# Altium PCB Alarm-Clock-v1.1.PcbDoc (part 3 of 4)
Units mm, origin at the board's own origin, x right, y up, seen from the top; angles counter-clockwise.
Board outline 56 x 73 mm, 2 copper layers (Top Layer, Bottom Layer), stack 1.448 mm thick; 146 components, 110 nets, 466 pads, 352 vias.
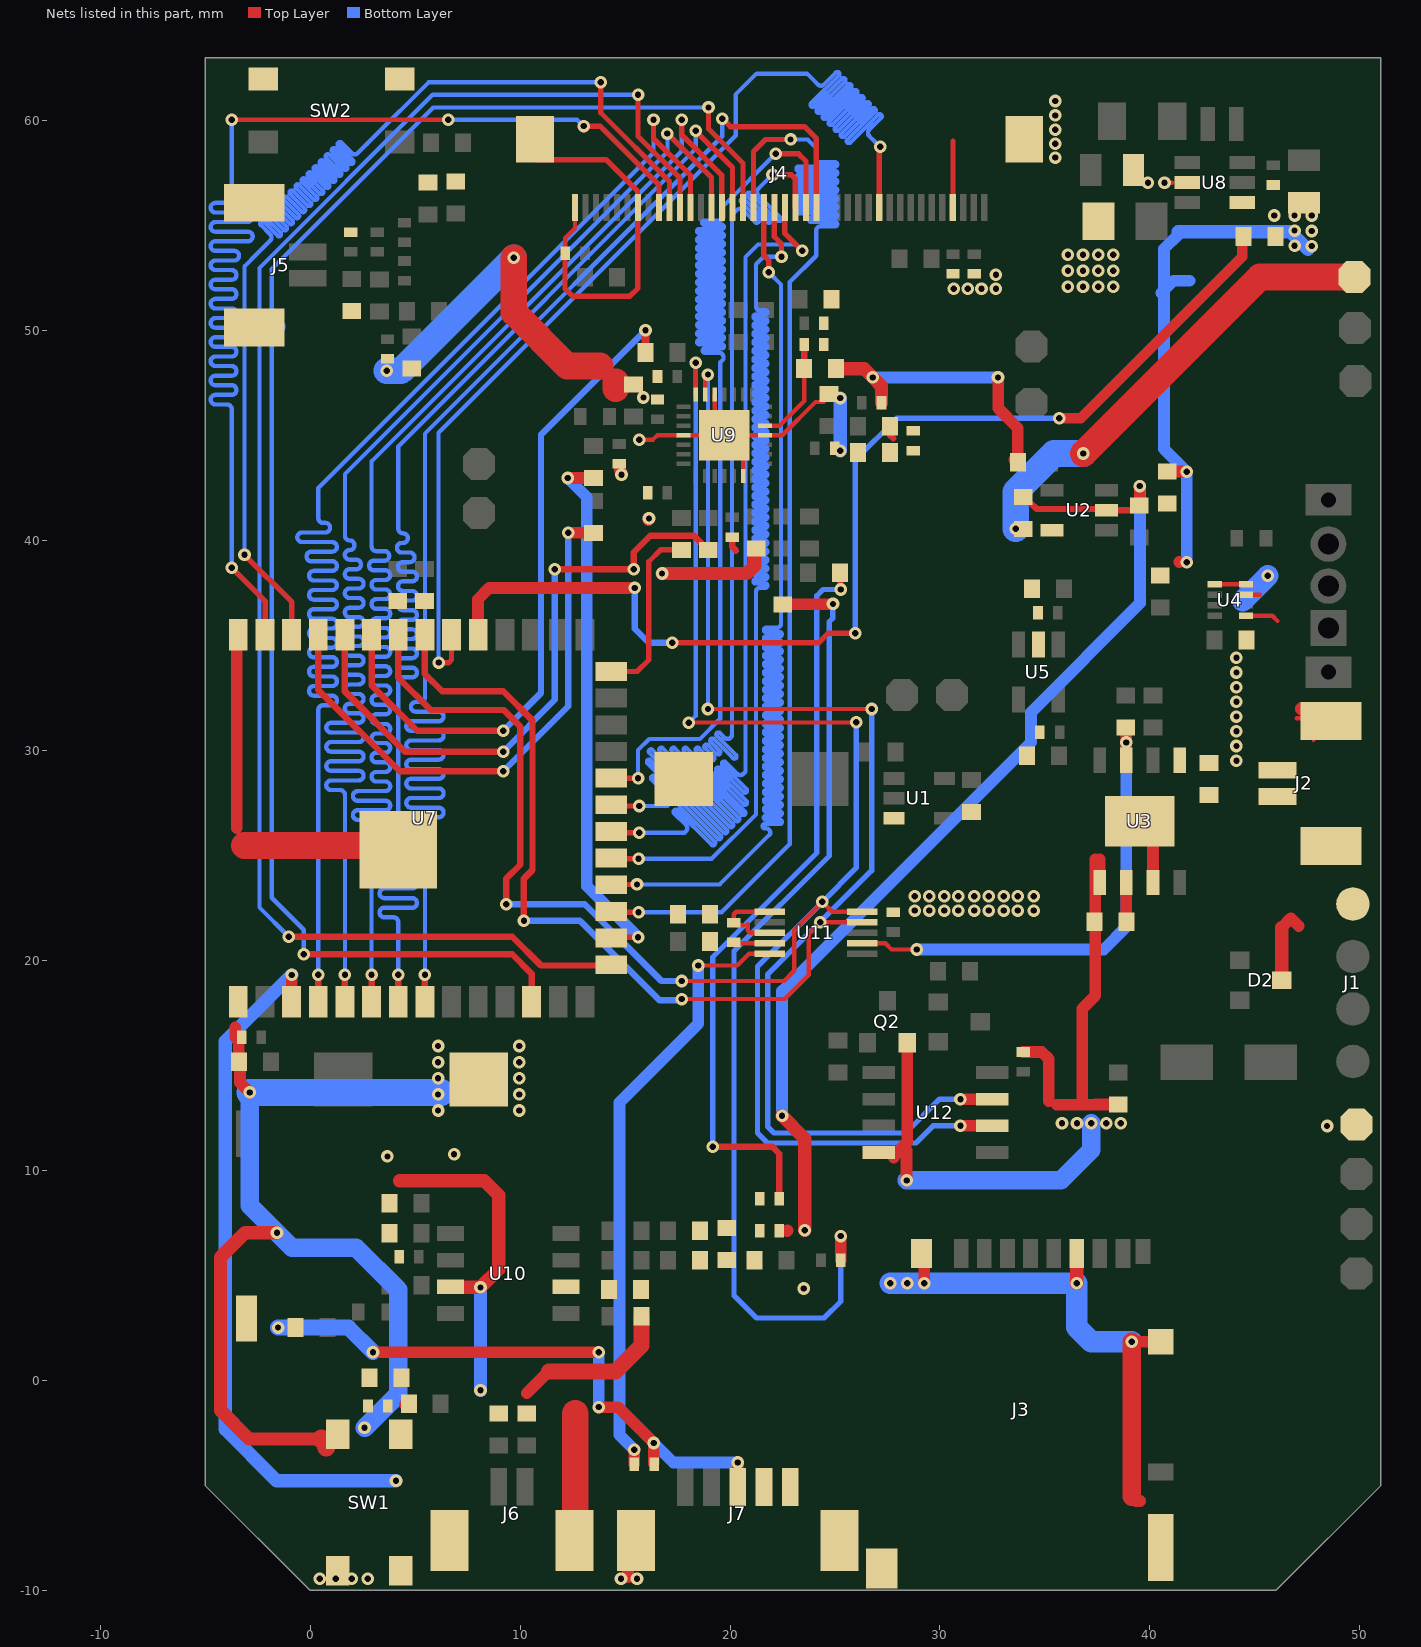
[diagram p2: the nets of this part, all layers, seen from the top]

## Via types
v1: diameter 0.6, hole 0.3, Top Layer to Bottom Layer, tented both sides, 187 vias
v2: diameter 0.6, hole 0.3, Top Layer to Bottom Layer, 165 vias

## Nets (pads, with @x,y where several pads share a name; then routed paths per layer and width w, separated by ;. In a path a pad name is that pad's centre, name@x,y a point inside that pad or via, vN(x,y) a via of type N, cw(c..) or ccw(c..) an arc to the next point about the centre after c; other vN are vias at no path point) (continued)
AGND: C4.2 C5.1 C7.2 C24.1 C25.1 C26.1 C27.2 C28.2 C29.2 C30.1 C31.1 C36.1 C37.1 C38.2 C39.2 C41.1 C43.1 C44.2 C45.2 C46.2 C47.2 C48.2 C49.2 C50.2 C51.2 C52.2 C53.2 C54.2 C57.2 J5.MP1 J5.MP2 J6.MP1 J6.MP2 R4.1 R27.2 R31.1 SB3.1 SB5.1 U2.2 U9.4 U9.13 U9.18 U9.26 U9.29 U10.7 | length 132.2
  Top Layer w0.203: v1(15.672,44.806) 16.332,44.806 16.543,45.017 U9.4@17.79,45.017 U9.29@19.273,45.017 ; v1(15.875,46.812) 15.9,46.787 v1@15.926,46.787 ; U9.29@19.273,45.467 U9.26@19.273,46.95 ; U9.29@20.173,45.017 U9.18@21.656,45.017 22.487,45.017 24.067,46.597 24.448,46.597 24.834,46.982 C38.2@24.859,46.982 ; U9.13@20.623,43.084 U9.29@20.623,44.567
  Top Layer w0.254: U9.29@19.273,45.467 U9.29@19.723,45.017
  Top Layer w0.305: C31.1@20.104,40.216 C31.1@20.104,40.165 20.104,39.701 20.283,39.522 ; C30.1@21.138,39.522 21.174,39.559 C30.1@21.247,39.632 ; C7.2@33.964,42.084 34.027,42.084 34.027,42.071 34.29,41.808 34.303,41.808 34.608,41.504 U2.2@37.925,41.504 ; U2.2@37.931,41.449 U2.2@37.929,41.451 ; C4.2@39.402,41.504 39.529,41.631 39.529,41.51 C4.2@39.522,41.504 ; C4.2@39.485,41.664 39.272,41.451 U2.2@37.929,41.451 ; U2.2@37.929,41.451 37.927,41.453 37.925,41.451 U2.2@37.929,41.451
  Top Layer w0.559: U10.7@6.763,4.453 U10.7@6.78,4.435 ; v1@8.108,4.435 v1(8.116,4.427) ; 10.325,-0.618 11.376,0.432 ; v1@14.745,43.34 14.834,43.252 v1(14.834,43.129) ; R31.1@15.782,2.975 R31.1@15.863,3.056 ; v1@16.117,40.978 16.142,41.003 v1(16.142,41.054) ; 22.721,7.12 22.738,7.137 ; v1@23.551,7.137 v1(23.559,7.145) ; v2@32.774,47.771 32.774,46.296 33.71,45.36 C5.1@33.71,43.735 ; C4.2@39.485,41.664 39.515,41.694 39.515,42.588 v2(39.522,42.596)
  Top Layer w0.635: 4.255,9.507 8.293,9.507 8.979,8.822 8.979,5.291 v1(8.116,4.427) ; U10.7@6.78,4.435 v1@8.108,4.435 ; v1(16.764,38.43) 20.803,38.43 21.174,38.802 21.174,39.559 21.174,39.568 21.238,39.632 C30.1@21.247,39.632 ; v1(22.479,12.598) 23.559,11.519 v1(23.559,7.145) ; C46.2@25.032,48.115 C46.2@25.1,48.184 ; C46.2@25.126,48.184 26.391,48.184 v2(26.803,47.771) 27.216,47.358 C39.2@27.216,46.566 ; C5.1@33.592,43.853 C5.1@33.71,43.735
  Top Layer w0.762: 11.376,0.432 14.554,0.432 15.782,1.659 R31.1@15.782,2.975
  Top Layer w1.27: v1(9.703,53.467) 9.703,50.851 12.243,48.311 13.81,48.311 ; J6.MP2@12.621,-7.516 12.621,-1.577 ; 14.554,47.244 14.554,47.567
  Bottom Layer w0.559: v1(22.479,12.598) 22.479,18.542 34.341,30.404 34.341,31.826 39.522,37.008 v2(39.522,42.596) ; v2(26.803,47.771) v2(32.766,47.771)
  Bottom Layer w0.635: v1(8.116,-0.475) v1(8.116,4.427) ; v1(25.248,44.272) v1(25.248,46.787)
  Bottom Layer w1.27: v1(3.658,48.082) 4.318,48.082 v1(9.703,53.467)
  other v1: 23.508,4.377
BAT_ADC: C59.2 R34.1 R35.1 U11.4 | length 1.7
  Top Layer w0.203: C59.2@20.181,20.861 20.223,20.818 U11.4@21.892,20.818
BATT: C6.1 J2.2 P2.1 R8.2 U3.5 U4.3 | length 2.5
  Top Layer w0.203: U4.3@44.568,37.418 45.245,37.418
  Top Layer w1.27: P2.1@49.759,12.116 P2.1@49.835,12.192
  Bottom Layer w1.016: 44.425,37.135 v2(45.618,38.329)
  other v2: 48.438,12.116 44.12,29.515 44.12,30.215 44.12,30.915 44.12,31.616 44.12,32.316 44.12,33.016 44.12,33.717 44.12,34.417
BUT: SB6.1 U11.5 | length 29.2
  Top Layer w0.203: v1(18.491,19.761) 20.342,19.761 20.899,20.318 U11.5@21.892,20.318
  Top Layer w0.559: SB6.1@15.443,-4 v1(15.443,-3.302)
  Bottom Layer w0.559: v1(15.443,-3.302) 14.732,-2.591 14.732,13.233 18.491,16.993 v1(18.491,19.761)
BUT_IN: J7.3 R2.2 SB6.2 SW3.2 | length 28.1
  Top Layer w0.559: v1(2.997,1.346) v1(13.754,1.346) ; v1@13.749,-1.278 14.667,-1.278 v1@16.364,-2.975 ; SB6.2@16.372,-3.962 v1(16.372,-2.983) ; J7.3@20.371,-5.075 v1@20.371,-4.013
  Bottom Layer w0.559: v1(13.754,-1.27) v1(13.754,1.346) ; v1(16.372,-2.983) 17.301,-3.912 v1(20.371,-3.912)
  Bottom Layer w0.762: v1(-1.524,2.515) 1.829,2.515 v1(2.997,1.346)
BYP: C57.1 U10.2
CHRG: R7.1 U3.7 U11.7 | length 23.5
  Top Layer w0.203: U11.7@26.292,20.818 27.393,20.818 27.688,20.523 v1(28.893,20.523)
  Top Layer w0.559: R7.1@38.773,31.072 38.791,31.072 38.867,30.996 38.867,30.394 v1(38.875,30.386) U3.7@38.875,29.536
  Bottom Layer w0.559: v1(28.893,20.523) 37.8,20.523 38.875,21.598 v1(38.875,30.386)
CODEC_3V3: C7.1 C44.1 C45.1 P5.1 R24.1 U2.5 | length 22.3
  Top Layer w0.305: R24.1@27.623,45.017 27.77,44.869
  Top Layer w1.27: v1(36.83,44.145) 45.237,52.553 P5.1@49.733,52.553
  Bottom Layer w1.27: v1(33.604,40.564) 33.604,42.316 35.433,44.145 v1(36.83,44.145)
DAC_R+: R23.1 SB1.1 | length 47.4
  Top Layer w0.559: R23.1@22.517,36.965 24.876,36.965 24.886,36.975 v1@24.891,36.969 ; SB1.1@25.273,5.723 v1(25.273,6.873)
  Bottom Layer w0.254: v1@24.888,36.972 24.888,36.293 24.727,36.131 24.727,24.981 20.193,20.447 20.193,4.039 21.26,2.972 24.486,2.972 25.273,3.759 v1(25.273,6.873)
  other v1: 24.905,36.982
DAC_R-: R22.1 SB2.1 | length 35.9
  Top Layer w0.305: v1(19.177,11.125) 22.022,11.125 22.352,10.795 SB2.1@22.352,8.644 ; R22.1@25.235,38.514 25.254,38.495 25.254,37.687 v1(25.273,37.668)
  Bottom Layer w0.254: v1(19.177,11.125) 19.177,20.168 24.13,25.121 24.13,37.363 24.435,37.668 v1(25.273,37.668)
DACVREF: C46.1 C47.1 U9.19 | length 5
  Top Layer w0.203: U9.19@21.656,45.467 22.353,45.467 23.533,46.647 C46.1@23.533,48.268
  Top Layer w0.305: C46.1@23.533,48.268 C47.1@23.533,49.258
EN_: C16.2 C17.2 R10.1 SW1.3 SW1.4 U7.3 | length 33.6
  Top Layer w0.559: U7.3@-0.881,18.024 -0.879,18.027 -0.879,19.309 v1(-0.876,19.312) ; R10.1@4.521,-1.143 R10.1@4.64,-1.024
  Bottom Layer w0.635: v1(-0.876,19.312) -4.039,16.149 -4.039,-2.337 -1.6,-4.775 v1(4.089,-4.775)
GND: C1.1 C2.2 C3.2 C6.2 C8.2 C9.2 C10.2 C11.2 C12.2 C13.2 C14.2 C15.2 C16.1 C17.1 C18.2 C19.2 C20.2 C21.2 C22.2 C23.2 C59.1 C60.2 C61.2 D2.3 J1.4 J2.1 J2.MP1 J2.MP2 J3.6 J3.S1 J3.S2 J3.S3 J3.S4 J4.4 J4.34 J4.40 J4.MP1 J4.MP2 J7.4 J7.5 J7.MP1 J7.MP2 Q2.2 R4.2 R5.1 R14.2 R16.1 R35.2 SW1.1 SW1.2 SW2.3 SW2.4 U1.3 U3.1 U3.3 U3.9 U4.1 U4.4 U4.5 U5.2 U7.1 U7.40 U7.41 U8.2 U11.1 U11.3 U12.4 | length 197.6
  Top Layer w0.203: C21.2@12.154,53.678 12.154,54.415 12.615,54.875 J4.40@12.615,55.863 ; 20.626,21.674 20.308,21.674 C59.1@20.181,21.801 20.181,22.199 20.3,22.318 U11.1@21.892,22.318 ; 20.841,21.725 20.841,21.437 20.96,21.318 U11.3@21.892,21.318 ; v2(40.693,57.041) 41.061,57.041 ; U4.5@43.088,37.918 U4.4@44.568,37.918 ; U4.1@44.568,36.418 45.827,36.418 46.076,36.17 ; 46.998,31.534 47.531,31.534 47.693,31.534 J2.MP2@47.79,31.437 ; J2.MP2@47.79,30.513 J2.MP2@47.79,31.437 ; J2.MP2@48.634,31.437 48.492,31.437 J2.MP2@47.79,31.437
  Top Layer w0.254: J4.MP1@10.77,58.141 14.097,58.141 15.592,56.646 15.592,55.876 15.605,55.863 15.605,52.003 15.24,51.638 12.497,51.638 12.141,51.994 12.141,53.665 C21.2@12.154,53.678 ; J4.4@30.615,55.863 30.617,55.866 30.617,59.009 30.62,59.012
  Top Layer w0.559: -3.568,16.823 -3.568,16.352 -3.404,16.188 -3.404,15.045 -3.342,14.983 -3.342,14.188 v2(-2.87,13.716) ; U7.1@-3.495,18.098 U7.1@-3.421,18.024 ; -3.495,26.314 -3.495,35.451 U7.40@-3.421,35.524 ; U7.41@3.997,25.476 U7.41@4.199,25.274 ; 15.138,-9.373 15.138,-8.585 15.521,-8.203 J7.MP1@15.521,-7.625 ; U12.4@27.794,10.6 27.794,10.684 28.446,11.336 Q2.2@28.446,16.077 ; 28.41,10.955 28.41,9.537 v1(28.423,9.525) ; v1@29.25,4.656 J3.S1@29.25,6.065 ; C61.2@33.973,15.642 34.852,15.642 35.179,15.314 35.179,13.31 ; 35.56,13.132 37.414,13.132 37.418,13.136 38.49,13.136 C3.2@38.494,13.14 ; J3.6@36.489,6.04 J3.6@36.491,6.042 ; 36.779,13.31 36.779,17.704 37.402,18.326 U3.1@37.402,23.909 ; 37.402,24.82 U3.1@37.402,23.909 ; U3.1@37.592,23.718 U3.1@37.402,23.909 ; U3.1@37.605,23.718 37.605,24.82 ; U3.9@39.06,26.627 U3.9@39.51,26.627 40.145,25.992 U3.3@40.145,23.718 ; 39.141,-5.529 39.352,-5.74 39.522,-5.74 ; v1@39.141,1.839 v1(39.141,1.837) 39.144,1.839 40.489,1.839 J3.S2@40.491,1.842 ; R4.2@40.831,43.289 40.835,43.285 41.754,43.285 v2(41.758,43.282) ; 41.402,38.964 41.402,38.989 ; 46.272,21.57 46.717,22.015 47.092,21.641
  Top Layer w0.635: v2(-1.575,7.036) -3.099,7.036 -4.267,5.867 -4.267,-1.422 -2.896,-2.794 0.546,-2.794 ; J4.MP2@33.964,59.164 J4.MP2@34.015,59.113 ; v1@36.515,4.631 J3.6@36.515,6.04 ; D2.3@46.272,19.06 46.272,21.57 ; J2.MP2@47.228,31.99 47.493,31.99 47.531,31.952 47.531,31.534 47.633,31.433 J2.MP2@47.785,31.433 ; J2.MP2@47.994,31.935 48.492,31.437 48.522,31.408 J2.MP2@48.626,31.408
  Top Layer w0.889: 0.546,-2.794 0.762,-3.01 0.762,-3.175 ; 39.141,-5.529 v1(39.141,1.837)
  Top Layer w1.27: -3.124,25.476 U7.41@3.997,25.476
  Bottom Layer w0.559: 40.538,51.791 40.665,51.918 ; 41.351,54.572 40.665,53.886 40.665,51.918 ; v2@41.758,39.167 v2@41.758,43.27 ; v2(41.758,43.282) 40.665,44.374 40.665,51.918 ; 41.885,52.375 41.123,52.375 40.665,51.918
  Bottom Layer w0.635: 41.351,54.704 46.687,54.704 v2@47.526,53.866
  Bottom Layer w0.889: v2@-2.87,13.71 -2.87,8.331 v2(-1.575,7.036) -0.864,6.325 2.184,6.325 4.191,4.318 4.191,-0.66 v1@2.599,-2.253 ; v1(28.423,9.525) 35.763,9.525 37.211,10.973 v2(37.211,12.243)
  Bottom Layer w1.016: v1(27.635,4.631) v1(28.442,4.631) v1(29.248,4.631) v1(36.513,4.631) 36.513,2.527 37.203,1.837 v1(39.141,1.837)
  Bottom Layer w1.27: v2@-2.87,13.71 v2@6.248,13.71
  other v1: 0.457,-9.449 1.219,-9.449 1.981,-9.449 2.743,-9.449 14.808,-9.449 15.57,-9.449 2.591,-2.261
  other v2: 3.683,10.668 6.858,10.77 35.814,12.243 36.525,12.243 37.922,12.243 38.608,12.243 6.096,12.852 9.96,12.852 6.096,13.621 9.96,13.621 6.096,14.389 9.96,14.389 6.096,15.158 9.96,15.158 6.096,15.926 9.96,15.926 28.804,22.377 29.489,22.377 30.201,22.377 30.875,22.377 31.637,22.377 32.323,22.377 33.034,22.377 33.709,22.377 34.471,22.377 28.804,23.063 29.489,23.063 30.201,23.063 30.875,23.063 31.637,23.063 32.323,23.063 33.034,23.063 33.709,23.063 34.471,23.063 41.758,38.964 30.658,51.994 31.318,51.994 31.979,51.994 32.664,51.994 36.093,52.095 36.813,52.095 37.533,52.095 38.252,52.095 32.664,52.654 36.093,52.857 36.813,52.857 37.533,52.857 38.252,52.857 36.093,53.619 36.813,53.619 37.533,53.619 38.252,53.619 46.891,54.043 47.701,54.026 47.701,54.745 46.891,54.763 45.923,55.483 46.891,55.483 47.701,55.483 39.906,57.041 35.484,58.242 35.484,58.903 35.484,59.563 35.484,60.249 35.484,60.935
I2C_PORT.SCL: R12.1 U7.34 U9.28 U11.10 U12.6 | length 98.9
  Top Layer w0.203: v1(17.704,19.025) 22.581,19.025 23.063,19.507 23.063,21.458 v1(24.397,22.792) 24.87,22.318 U11.10@26.292,22.318 ; v1(18.034,31.318) 18.047,31.331 25.997,31.331 v1(26.01,31.344) ; U9.28@18.365,46.959 U9.28@18.365,47.257 ; U9.28@18.364,47.258 v1(18.364,48.463)
  Top Layer w0.305: U7.34@4.199,35.524 4.199,33.47 5.74,31.928 9.22,31.928 10.008,31.14 10.008,24.562 9.347,23.901 v1(9.347,22.682)
  Top Layer w0.559: v1(30.976,12.124) U12.6@32.482,12.124
  Bottom Layer w0.203: v1(18.034,31.318) 18.364,31.648 v1(18.364,48.463)
  Bottom Layer w0.254: v1(26.01,31.344) 26.01,24.404 v1(24.397,22.792) 21.311,19.705 21.311,11.786 21.793,11.303 28.854,11.303 29.675,12.124 v1(30.976,12.124)
  Bottom Layer w0.305: v1(9.347,22.682) 13.081,22.682 16.739,19.025 v1(17.704,19.025)
I2C_PORT.SDA: R11.1 U7.33 U9.27 U11.9 U12.7 | length 96.2
  Top Layer w0.203: v1(17.704,18.161) 22.606,18.161 23.749,19.304 23.749,21.28 v1(24.295,21.826) 24.299,21.822 26.288,21.822 U11.9@26.292,21.818 ; U9.27@18.823,46.95 18.823,47.672 18.948,47.797 v1(18.948,47.904) ; v1@19.05,31.979 v1(26.746,31.979)
  Top Layer w0.305: U7.33@5.469,35.524 5.469,33.647 6.293,32.823 9.195,32.823 10.592,31.426 10.592,24.308 10.185,23.901 v1(10.185,21.895)
  Top Layer w0.559: v1(30.976,13.394) U12.7@32.482,13.394
  Bottom Layer w0.203: v1(18.948,31.979) v1(18.948,47.904) ; v1@18.974,32.055 v1@19.05,31.979
  Bottom Layer w0.254: v1(26.746,31.979) 26.746,24.277 v1(24.295,21.826) 21.793,19.324 21.793,12.09 22.098,11.786 28.372,11.786 29.98,13.394 v1(30.976,13.394)
  Bottom Layer w0.305: v1(10.185,21.895) 12.852,21.895 16.643,18.105 17.647,18.105 v1(17.704,18.161)
I2S_DIN: R21.2 U7.36 | length 29.8
  Top Layer w0.305: U7.36@1.659,35.524 1.659,32.809 4.521,29.947 v1@9.119,29.947 ; v1(11.659,38.633) v1(15.418,38.633) 15.418,39.446 16.205,40.234 18.283,40.234 18.669,39.848 18.669,39.784 18.898,39.556 R21.2@18.961,39.556
  Bottom Layer w0.305: v1(9.195,29.947) 11.659,32.41 v1(11.659,38.633)
I2S_DOUT: R19.2 U7.37 | length 26.9
  Top Layer w0.305: U7.37@0.389,35.524 0.389,32.885 4.267,29.007 v1@9.144,29.007
  Top Layer w0.559: v1(12.297,40.368) R19.2@13.5,40.368
  Bottom Layer w0.305: v1(9.195,29.007) 12.297,32.109 v1(12.297,40.368)
I2S_LRCK: R20.2 U7.26 | length 8.5
  Top Layer w0.254: U7.26@14.339,33.764 15.578,33.764 16.129,34.315 16.129,38.989 16.696,39.556 R20.2@17.691,39.556
I2S_MCLK: R17.2 U7.35 | length 32.5
  Top Layer w0.305: U7.35@2.929,35.524 2.929,33.114 5.105,30.937 v1(9.195,30.937)
  Top Layer w0.381: R17.2@15.964,48.954 15.97,48.96 15.97,50.006 v1(15.977,50.013)
  Bottom Layer w0.305: v1(9.195,30.937) 10.998,32.741 10.998,45.034 v1(15.977,50.013)
I2S_SCLK: R18.2 U7.16 | length 25.8
  Top Layer w0.254: U7.16@14.339,21.064 14.382,21.107 v1(15.621,21.107)
  Top Layer w0.559: v1(12.275,42.981) 13.335,42.981 13.339,42.985 R18.2@13.5,42.985
  Bottom Layer w0.559: v1(12.275,42.981) 13.183,42.074 13.183,23.546 v1(15.621,21.107)
IN+#: C55.1 C58.2 R32.1
IN-#: C56.1 C58.1 SB2.2 SB3.2
ISET: R5.2 U3.2 | length 1.9
  Top Layer w0.559: R5.2@38.875,21.852 U3.2@38.875,23.718
LCD_BL_EN: R14.1 U7.31 U8.4 | length 54
  Top Layer w0.254: v1(17.247,35.128) 24.219,35.128 24.676,35.585 v1(25.959,35.585)
  Top Layer w0.508: v1(35.687,45.822) 36.703,45.822 44.402,53.52 R14.1@44.402,54.419
  Top Layer w0.559: U7.31@7.996,35.512 7.996,37.206 8.534,37.744 v1(15.462,37.744)
  Top Layer w0.635: R14.1@44.402,54.419 R14.1@44.465,54.483
  Bottom Layer w0.254: v1(25.959,35.585) 25.959,43.84 27.94,45.822 v1(35.687,45.822)
  Bottom Layer w0.305: v1(15.462,37.744) 15.462,35.795 16.129,35.128 v1(17.247,35.128)
LCD_CS: J4.11 U7.32 | length 76.1
  Top Layer w0.254: v1(6.121,34.188) 6.135,34.175 6.59,34.175 6.739,34.324 U7.32@6.739,35.524 ; J4.11@27.115,55.863 v1@27.115,58.75
  Bottom Layer w0.203: v1(6.121,34.188) 6.121,45.136 20.269,59.284 20.269,61.239 21.268,62.238 23.665,62.238 24.113,61.79 24.184,61.718 ccw(c24.328,61.862) 24.472,61.718 25.041,62.288 cw(c25.113,62.216) 25.185,62.288 cw(c25.113,62.216) 25.185,62.144 23.868,60.827 ccw(c23.94,60.756) 23.868,60.684 ccw(c23.94,60.756) 24.012,60.684 25.329,62.001 cw(c25.401,61.929) 25.473,62.001 cw(c25.401,61.929) 25.473,61.857 24.156,60.54 ccw(c24.227,60.468) 24.156,60.396 ccw(c24.227,60.468) 24.299,60.396 25.616,61.713 cw(c25.688,61.641) 25.76,61.713 cw(c25.688,61.641) 25.76,61.57 24.443,60.253 ccw(c24.515,60.181) 24.443,60.109 ccw(c24.515,60.181) 24.587,60.109 25.904,61.426 cw(c25.975,61.354) 26.047,61.426 cw(c25.975,61.354) 26.047,61.282 24.73,59.965 ccw(c24.802,59.893) 24.73,59.822 ccw(c24.802,59.893) 24.874,59.822 26.191,61.139 cw(c26.263,61.067) 26.335,61.139 cw(c26.263,61.067) 26.335,60.995 25.018,59.678 ccw(c25.089,59.606) 25.018,59.534 ccw(c25.089,59.606) 25.161,59.534 26.478,60.851 cw(c26.55,60.779) 26.622,60.851 cw(c26.55,60.779) 26.622,60.707 25.305,59.391 ccw(c25.377,59.319) 25.305,59.247 ccw(c25.377,59.319) 25.449,59.247 26.766,60.564 cw(c26.838,60.492) 26.909,60.564 cw(c26.838,60.492) 26.909,60.42 25.592,59.103 ccw(c25.664,59.031) 25.592,58.959 ccw(c25.664,59.031) 25.736,58.959 27.053,60.276 cw(c27.125,60.205) 27.197,60.276 cw(c27.125,60.205) 27.197,60.133 26.627,59.563 ccw(c26.771,59.419) 26.627,59.276 26.883,59.019 v1(27.153,58.75)
LCD_DB1: J4.17 U7.8 | length 76
  Top Layer w0.254: v1(19.634,60.096) 20.015,59.715 23.546,59.715 24.115,59.146 J4.17@24.115,55.863
  Top Layer w0.305: U7.8@5.469,18.024 v1(5.469,19.32)
  Bottom Layer w0.203: v1(5.469,19.32) 5.469,26.035 5.469,26.137 ccw(c5.24,26.137) 5.24,26.365 4.808,26.365 cw(c4.808,26.594) 4.808,26.822 6.129,26.822 ccw(c6.129,27.051) 6.129,27.28 4.808,27.28 cw(c4.808,27.508) 4.808,27.737 6.129,27.737 ccw(c6.129,27.965) 6.129,28.194 4.808,28.194 cw(c4.808,28.423) 4.808,28.651 6.129,28.651 ccw(c6.129,28.88) 6.129,29.108 4.808,29.108 cw(c4.808,29.337) 4.808,29.566 6.129,29.566 ccw(c6.129,29.794) 6.129,30.023 4.808,30.023 cw(c4.808,30.251) 4.808,30.48 6.129,30.48 ccw(c6.129,30.709) 6.129,30.937 4.808,30.937 cw(c4.808,31.166) 4.808,31.394 6.129,31.394 ccw(c6.129,31.623) 6.129,31.852 5.029,31.852 cw(c5.029,32.08) 5.029,32.309 5.24,32.309 ccw(c5.24,32.537) 5.469,32.537 5.469,33.147 5.469,45.093 19.634,59.258 v1(19.634,60.096)
LCD_DB2: J4.18 U7.22 | length 75.8
  Top Layer w0.254: U7.22@14.339,28.684 14.346,28.677 v1(15.621,28.677) ; v1(22.174,58.42) 23.266,58.42 23.618,58.068 J4.18@23.618,55.917
  Bottom Layer w0.203: v1(15.621,28.677) 15.621,30.023 16.152,30.554 18.565,30.554 19.533,31.521 19.533,48.489 19.685,48.641 19.685,48.743 ccw(c19.482,48.743) 19.482,48.946 18.803,48.946 cw(c18.803,49.047) 18.803,49.149 19.609,49.149 ccw(c19.609,49.251) 19.609,49.352 18.534,49.352 cw(c18.534,49.454) 18.534,49.555 19.609,49.555 ccw(c19.609,49.657) 19.609,49.759 18.534,49.759 cw(c18.534,49.86) 18.534,49.962 19.609,49.962 ccw(c19.609,50.063) 19.609,50.165 18.534,50.165 cw(c18.534,50.267) 18.534,50.368 19.609,50.368 ccw(c19.609,50.47) 19.609,50.571 18.534,50.571 cw(c18.534,50.673) 18.534,50.775 19.609,50.775 ccw(c19.609,50.876) 19.609,50.978 18.534,50.978 cw(c18.534,51.079) 18.534,51.181 19.609,51.181 ccw(c19.609,51.283) 19.609,51.384 18.534,51.384 cw(c18.534,51.486) 18.534,51.587 19.609,51.587 ccw(c19.609,51.689) 19.609,51.791 18.534,51.791 cw(c18.534,51.892) 18.534,51.994 19.609,51.994 ccw(c19.609,52.095) 19.609,52.197 18.534,52.197 cw(c18.534,52.299) 18.534,52.4 19.609,52.4 ccw(c19.609,52.502) 19.609,52.603 18.534,52.603 cw(c18.534,52.705) 18.534,52.807 19.609,52.807 ccw(c19.609,52.908) 19.609,53.01 18.534,53.01 cw(c18.534,53.111) 18.534,53.213 19.609,53.213 ccw(c19.609,53.315) 19.609,53.416 18.534,53.416 cw(c18.534,53.518) 18.534,53.619 19.609,53.619 ccw(c19.609,53.721) 19.609,53.823 18.534,53.823 cw(c18.534,53.924) 18.534,54.026 19.609,54.026 ccw(c19.609,54.127) 19.609,54.229 18.534,54.229 cw(c18.534,54.331) 18.534,54.432 19.609,54.432 ccw(c19.609,54.534) 19.609,54.635 18.534,54.635 cw(c18.534,54.737) 18.534,54.839 19.609,54.839 ccw(c19.609,54.94) 19.609,55.042 18.776,55.042 cw(c18.776,55.143) 18.776,55.245 19.482,55.245 ccw(c19.482,55.448) 19.685,55.448 19.685,55.865 19.685,55.931 v1(22.174,58.42)
LCD_DB3: J4.19 U7.21 | length 75.7
  Top Layer w0.254: U7.21@14.339,27.414 14.397,27.356 v1(15.672,27.356) ; v1(22.022,57.429) 22.911,57.429 23.115,57.225 J4.19@23.115,55.863
  Bottom Layer w0.203: v1(15.672,27.356) 17.018,27.356 17.063,27.401 17.135,27.473 ccw(c16.991,27.616) 17.135,27.76 16.272,28.623 cw(c16.344,28.694) 16.272,28.766 cw(c16.344,28.694) 16.416,28.766 17.352,27.83 ccw(c17.424,27.902) 17.496,27.83 ccw(c17.424,27.902) 17.496,27.974 16.074,29.396 cw(c16.146,29.468) 16.074,29.539 cw(c16.146,29.468) 16.218,29.539 17.639,28.118 ccw(c17.711,28.19) 17.783,28.118 ccw(c17.711,28.19) 17.783,28.261 16.163,29.882 cw(c16.234,29.954) 16.163,30.025 cw(c16.234,29.954) 16.306,30.025 17.927,28.405 ccw(c17.998,28.477) 18.07,28.405 ccw(c17.998,28.477) 18.07,28.549 16.662,29.957 cw(c16.734,30.029) 16.662,30.101 cw(c16.734,30.029) 16.806,30.101 18.214,28.692 ccw(c18.286,28.764) 18.358,28.692 ccw(c18.286,28.764) 18.358,28.836 17.237,29.957 cw(c17.308,30.029) 17.237,30.101 cw(c17.308,30.029) 17.38,30.101 18.501,28.98 ccw(c18.573,29.052) 18.645,28.98 ccw(c18.573,29.052) 18.645,29.124 17.811,29.957 cw(c17.883,30.029) 17.811,30.101 cw(c17.883,30.029) 17.955,30.101 18.789,29.267 ccw(c18.861,29.339) 18.932,29.267 ccw(c18.861,29.339) 18.932,29.411 18.386,29.957 cw(c18.458,30.029) 18.386,30.101 cw(c18.458,30.029) 18.53,30.101 19.076,29.555 ccw(c19.148,29.626) 19.22,29.555 ccw(c19.148,29.626) 19.22,29.698 18.806,30.112 cw(c18.878,30.184) 18.806,30.256 cw(c18.878,30.184) 18.95,30.256 19.363,29.842 ccw(c19.435,29.914) 19.507,29.842 ccw(c19.435,29.914) 19.507,29.986 19.093,30.4 cw(c19.165,30.471) 19.093,30.543 cw(c19.165,30.471) 19.237,30.543 20.136,29.644 ccw(c20.208,29.716) 20.28,29.644 ccw(c20.208,29.716) 20.28,29.788 19.381,30.687 cw(c19.452,30.759) 19.381,30.831 cw(c19.452,30.759) 19.524,30.831 19.745,30.61 ccw(c19.888,30.754) 20.091,30.754 20.091,31.064 20.091,55.499 20.119,55.527 20.335,55.742 cw(c20.478,55.599) 20.622,55.742 21.199,55.165 ; 21.2,55.164 ccw(c21.272,55.236) 21.344,55.164 ccw(c21.272,55.236) 21.344,55.308 20.544,56.108 cw(c20.616,56.179) 20.544,56.251 cw(c20.616,56.179) 20.688,56.251 21.775,55.164 ccw(c21.847,55.236) 21.918,55.164 ccw(c21.847,55.236) 21.918,55.308 20.832,56.395 cw(c20.903,56.467) 20.832,56.539 cw(c20.903,56.467) 20.975,56.539 22.266,55.247 ccw(c22.338,55.319) 22.41,55.247 ccw(c22.338,55.319) 22.41,55.391 21.34,56.461 cw(c21.484,56.604) 21.341,56.748 21.742,57.15 v1(22.022,57.429)
LCD_DB4: J4.20 U7.20 | length 76.3
  Top Layer w0.254: U7.20@14.339,26.144 14.397,26.086 v1(15.672,26.086) ; J4.20@22.615,55.863 22.615,54.626 v1(23.444,53.797)
  Bottom Layer w0.203: v1(15.672,26.086) 17.831,26.086 17.903,26.158 ccw(c17.759,26.301) 17.903,26.445 17.346,27.001 cw(c17.418,27.073) 17.346,27.145 cw(c17.418,27.073) 17.49,27.145 19.119,25.516 ccw(c19.191,25.588) 19.262,25.516 ccw(c19.191,25.588) 19.262,25.66 17.634,27.289 cw(c17.705,27.361) 17.634,27.433 cw(c17.705,27.361) 17.777,27.433 19.406,25.804 ccw(c19.478,25.875) 19.55,25.804 ccw(c19.478,25.875) 19.55,25.947 17.921,27.576 cw(c17.993,27.648) 17.921,27.72 cw(c17.993,27.648) 18.065,27.72 19.694,26.091 ccw(c19.765,26.163) 19.837,26.091 ccw(c19.765,26.163) 19.837,26.235 18.208,27.864 cw(c18.28,27.935) 18.208,28.007 cw(c18.28,27.935) 18.352,28.007 19.981,26.378 ccw(c20.053,26.45) 20.125,26.522 18.496,28.151 cw(c18.567,28.223) 18.496,28.295 cw(c18.567,28.223) 18.639,28.295 20.268,26.666 ccw(c20.34,26.738) 20.412,26.666 ccw(c20.34,26.738) 20.412,26.809 18.783,28.438 cw(c18.855,28.51) 18.783,28.582 cw(c18.855,28.51) 18.927,28.582 20.556,26.953 ccw(c20.627,27.025) 20.699,26.953 ccw(c20.627,27.025) 20.699,27.097 19.07,28.726 cw(c19.142,28.798) 19.07,28.869 cw(c19.142,28.798) 19.214,28.869 20.638,27.446 ccw(c20.71,27.517) 20.782,27.446 ccw(c20.71,27.517) 20.782,27.589 19.358,29.013 cw(c19.43,29.085) 19.358,29.157 cw(c19.43,29.085) 19.501,29.157 20.638,28.02 ccw(c20.71,28.092) 20.782,28.02 ccw(c20.71,28.092) 20.782,28.164 19.645,29.3 cw(c19.717,29.372) 19.645,29.444 cw(c19.717,29.372) 19.789,29.444 20.345,28.888 ccw(c20.489,29.031) 20.633,28.888 20.733,28.988 20.733,29.28 20.733,53.499 21.336,54.102 23.127,54.102 23.432,53.797 v1(23.444,53.797)
LCD_DB5: J4.21 U7.19 | length 75.5
  Top Layer w0.254: U7.19@14.339,24.874 14.372,24.841 v1(15.646,24.841) v1@15.672,24.841 ; J4.21@22.115,55.863 22.115,54.471 22.454,54.133 v1@22.454,53.442
  Bottom Layer w0.203: v1(15.646,24.841) 19.126,24.841 21.234,26.949 21.234,37.248 21.234,37.553 cw(c21.438,37.553) 21.438,37.756 21.674,37.756 ccw(c21.674,37.858) 21.674,37.959 21.215,37.959 cw(c21.215,38.061) 21.215,38.162 21.674,38.162 ccw(c21.674,38.264) 21.674,38.366 21.215,38.366 cw(c21.215,38.467) 21.215,38.569 21.674,38.569 ccw(c21.674,38.67) 21.674,38.772 21.215,38.772 cw(c21.215,38.874) 21.215,38.975 21.674,38.975 ccw(c21.674,39.077) 21.674,39.178 21.215,39.178 cw(c21.215,39.28) 21.215,39.382 21.674,39.382 ccw(c21.674,39.483) 21.674,39.585 21.215,39.585 cw(c21.215,39.686) 21.215,39.788 21.674,39.788 ccw(c21.674,39.89) 21.674,39.991 21.215,39.991 cw(c21.215,40.093) 21.215,40.194 21.674,40.194 ccw(c21.674,40.296) 21.674,40.398 21.215,40.398 cw(c21.215,40.499) 21.215,40.601 21.674,40.601 ccw(c21.674,40.702) 21.674,40.804 21.215,40.804 cw(c21.215,40.906) 21.215,41.007 21.674,41.007 ccw(c21.674,41.109) 21.674,41.21 21.215,41.21 cw(c21.215,41.312) 21.215,41.414 21.674,41.414 ccw(c21.674,41.515) 21.674,41.617 21.215,41.617 cw(c21.215,41.718) 21.215,41.82 21.674,41.82 ccw(c21.674,41.922) 21.674,42.023 21.215,42.023 cw(c21.215,42.125) 21.215,42.226 21.674,42.226 ccw(c21.674,42.328) 21.674,42.43 21.215,42.43 cw(c21.215,42.531) 21.215,42.633 21.674,42.633 ccw(c21.674,42.734) 21.674,42.836 21.215,42.836 cw(c21.215,42.938) 21.215,43.039 21.674,43.039 ccw(c21.674,43.141) 21.674,43.242 21.215,43.242 cw(c21.215,43.344) 21.215,43.446 21.674,43.446 ccw(c21.674,43.547) 21.674,43.649 21.215,43.649 cw(c21.215,43.75) 21.215,43.852 21.674,43.852 ccw(c21.674,43.954) 21.674,44.055 21.215,44.055 cw(c21.215,44.157) 21.215,44.258 21.674,44.258 ccw(c21.674,44.36) 21.674,44.462 21.215,44.462 cw(c21.215,44.563) 21.215,44.665 21.674,44.665 ccw(c21.674,44.766) 21.674,44.868 21.215,44.868 cw(c21.215,44.97) 21.215,45.071 21.674,45.071 ccw(c21.674,45.173) 21.674,45.274 21.215,45.274 cw(c21.215,45.376) 21.215,45.478 21.674,45.478 ccw(c21.674,45.579) 21.674,45.681 21.215,45.681 cw(c21.215,45.782) 21.215,45.884 21.674,45.884 ccw(c21.674,45.986) 21.674,46.087 21.215,46.087 cw(c21.215,46.189) 21.215,46.29 21.674,46.29 ccw(c21.674,46.392) 21.674,46.494 21.215,46.494 cw(c21.215,46.595) 21.215,46.697 21.674,46.697 ccw(c21.674,46.798) 21.674,46.9 21.215,46.9 cw(c21.215,47.002) 21.215,47.103 21.674,47.103 ccw(c21.674,47.205) 21.674,47.306 21.215,47.306 cw(c21.215,47.408) 21.215,47.51 21.674,47.51 ccw(c21.674,47.611) 21.674,47.713 21.215,47.713 cw(c21.215,47.814) 21.215,47.916 21.674,47.916 ccw(c21.674,48.018) 21.674,48.119 21.215,48.119 cw(c21.215,48.221) 21.215,48.322 21.674,48.322 ccw(c21.674,48.424) 21.674,48.526 21.215,48.526 cw(c21.215,48.627) 21.215,48.729 21.674,48.729 ccw(c21.674,48.83) 21.674,48.932 21.215,48.932 cw(c21.215,49.034) 21.215,49.135 21.674,49.135 ccw(c21.674,49.237) 21.674,49.338 21.215,49.338 cw(c21.215,49.44) 21.215,49.542 21.674,49.542 ccw(c21.674,49.643) 21.674,49.745 21.215,49.745 cw(c21.215,49.846) 21.215,49.948 21.674,49.948 ccw(c21.674,50.05) 21.674,50.151 21.215,50.151 cw(c21.215,50.253) 21.215,50.354 21.674,50.354 ccw(c21.674,50.456) 21.674,50.558 21.215,50.558 cw(c21.215,50.659) 21.215,50.761 21.674,50.761 ccw(c21.674,50.862) 21.674,50.964 21.438,50.964 cw(c21.438,51.167) 21.234,51.167 21.234,51.768 21.234,53.162 21.59,53.518 v1(22.454,53.518)
LCD_DB6: J4.22 U7.18 | length 74.9
  Top Layer w0.254: U7.18@14.339,23.604 14.356,23.622 v1(15.57,23.622) ; J4.22@21.615,55.863 21.615,53.569 21.844,53.34 v1(21.844,52.781)
  Bottom Layer w0.203: v1(15.57,23.622) 19.507,23.622 21.669,25.784 21.915,26.03 21.915,26.089 ccw(c21.712,26.089) 21.712,26.292 21.656,26.292 cw(c21.656,26.394) 21.656,26.495 22.365,26.495 ccw(c22.365,26.597) 22.365,26.699 21.714,26.699 cw(c21.714,26.8) 21.714,26.902 22.365,26.902 ccw(c22.365,27.003) 22.365,27.105 21.717,27.105 cw(c21.717,27.207) 21.717,27.308 22.365,27.308 ccw(c22.365,27.41) 22.365,27.511 21.717,27.511 cw(c21.717,27.613) 21.717,27.715 22.365,27.715 ccw(c22.365,27.816) 22.365,27.918 21.717,27.918 cw(c21.717,28.019) 21.717,28.121 22.365,28.121 ccw(c22.365,28.223) 22.365,28.324 21.717,28.324 cw(c21.717,28.426) 21.717,28.527 22.365,28.527 ccw(c22.365,28.629) 22.365,28.731 21.717,28.731 cw(c21.717,28.832) 21.717,28.934 22.365,28.934 ccw(c22.365,29.035) 22.365,29.137 21.717,29.137 cw(c21.717,29.239) 21.717,29.34 22.365,29.34 ccw(c22.365,29.442) 22.365,29.543 21.717,29.543 cw(c21.717,29.645) 21.717,29.747 22.365,29.747 ccw(c22.365,29.848) 22.365,29.95 21.717,29.95 cw(c21.717,30.051) 21.717,30.153 22.365,30.153 ccw(c22.365,30.255) 22.365,30.356 21.717,30.356 cw(c21.717,30.458) 21.717,30.559 22.365,30.559 ccw(c22.365,30.661) 22.365,30.763 21.717,30.763 cw(c21.717,30.864) 21.717,30.966 22.365,30.966 ccw(c22.365,31.067) 22.365,31.169 21.717,31.169 cw(c21.717,31.271) 21.717,31.372 22.365,31.372 ccw(c22.365,31.474) 22.365,31.575 21.717,31.575 cw(c21.717,31.677) 21.717,31.779 22.365,31.779 ccw(c22.365,31.88) 22.365,31.982 21.717,31.982 cw(c21.717,32.083) 21.717,32.185 22.365,32.185 ccw(c22.365,32.287) 22.365,32.388 21.717,32.388 cw(c21.717,32.49) 21.717,32.591 22.365,32.591 ccw(c22.365,32.693) 22.365,32.795 21.717,32.795 cw(c21.717,32.896) 21.717,32.998 22.365,32.998 ccw(c22.365,33.099) 22.365,33.201 21.717,33.201 cw(c21.717,33.303) 21.717,33.404 22.365,33.404 ccw(c22.365,33.506) 22.365,33.607 21.717,33.607 cw(c21.717,33.709) 21.717,33.811 22.365,33.811 ccw(c22.365,33.912) 22.365,34.014 21.717,34.014 cw(c21.717,34.115) 21.717,34.217 22.365,34.217 ccw(c22.365,34.319) 22.365,34.42 21.717,34.42 cw(c21.717,34.522) 21.717,34.623 22.365,34.623 ccw(c22.365,34.725) 22.365,34.827 21.717,34.827 cw(c21.717,34.928) 21.717,35.03 22.365,35.03 ccw(c22.365,35.131) 22.365,35.233 21.717,35.233 cw(c21.717,35.335) 21.717,35.436 22.365,35.436 ccw(c22.365,35.538) 22.365,35.639 21.717,35.639 cw(c21.717,35.741) 21.717,35.843 22.225,35.843 ccw(c22.225,36.046) 22.428,36.046 22.428,36.732 22.428,52.197 v1(21.844,52.781)
LCD_DB7: J4.23 U7.17 | length 76.1
  Top Layer w0.254: U7.17@14.339,22.334 14.372,22.301 v1(15.646,22.301) ; J4.23@21.115,55.863 21.115,58.529 21.692,59.106 v1(22.885,59.106)
  Bottom Layer w0.203: v1(15.646,22.301) 19.609,22.301 22.847,25.54 22.847,52.311 24.105,53.569 24.105,54.458 24.105,54.762 cw(c24.308,54.762) 24.308,54.966 25.003,54.966 ccw(c25.003,55.067) 25.003,55.169 23.883,55.169 cw(c23.883,55.27) 23.883,55.372 25.003,55.372 ccw(c25.003,55.474) 25.003,55.575 23.263,55.575 cw(c23.263,55.677) 23.263,55.778 25.003,55.778 ccw(c25.003,55.88) 25.003,55.982 23.263,55.982 cw(c23.263,56.083) 23.263,56.185 25.003,56.185 ccw(c25.003,56.286) 25.003,56.388 23.263,56.388 cw(c23.263,56.49) 23.263,56.591 25.003,56.591 ccw(c25.003,56.693) 25.003,56.794 23.263,56.794 cw(c23.263,56.896) 23.263,56.998 25.003,56.998 ccw(c25.003,57.099) 25.003,57.201 23.263,57.201 cw(c23.263,57.302) 23.263,57.404 25.003,57.404 ccw(c25.003,57.506) 25.003,57.607 23.263,57.607 cw(c23.263,57.709) 23.263,57.81 25.003,57.81 ccw(c25.003,57.912) 25.003,58.014 24.308,58.014 cw(c24.308,58.217) 24.105,58.217 24.105,58.699 23.698,59.106 v1(22.885,59.106)
LCD_DB8: J4.24 U7.12 | length 76
  Top Layer w0.254: v1(18.974,60.63) 18.974,59.614 20.615,57.973 J4.24@20.615,55.863
  Top Layer w0.305: v1(-0.305,20.295) 9.627,20.295 10.549,19.373 U7.12@10.549,18.024
  Bottom Layer w0.203: v1(-0.305,20.295) -0.305,21.463 -1.829,22.987 -1.829,47.59 -1.829,49.174 -1.829,49.733 cw(c-1.6,49.733) -1.6,49.962 -1.495,49.962 ccw(c-1.495,50.19) -1.495,50.419 -1.6,50.419 cw(c-1.6,50.648) -1.829,50.648 -1.829,52.578 -1.829,52.934 5.867,60.63 v1(18.974,60.63)
LCD_DB9: J4.25 U7.7 | length 76
  Top Layer w0.254: v1(18.364,59.512) 20.115,57.761 J4.25@20.115,55.863
  Top Layer w0.305: U7.7@4.199,18.024 v1(4.199,19.32)
  Bottom Layer w0.203: v1(4.199,19.32) 4.199,21.725 4.199,21.827 ccw(c3.97,21.827) 3.97,22.055 3.538,22.055 cw(c3.538,22.284) 3.538,22.513 4.859,22.513 ccw(c4.859,22.741) 4.859,22.97 3.538,22.97 cw(c3.538,23.198) 3.538,23.427 4.859,23.427 ccw(c4.859,23.656) 4.859,23.884 3.538,23.884 cw(c3.538,24.113) 3.538,24.341 4.859,24.341 ccw(c4.859,24.57) 4.859,24.799 3.538,24.799 cw(c3.538,25.027) 3.538,25.256 4.859,25.256 ccw(c4.859,25.484) 4.859,25.713 3.538,25.713 cw(c3.538,25.942) 3.538,26.17 3.97,26.17 ccw(c3.97,26.399) 4.199,26.399 4.199,33.257 cw(c4.427,33.257) 4.427,33.485 4.859,33.485 ccw(c4.859,33.714) 4.859,33.943 4.419,33.943 cw(c4.419,34.171) 4.419,34.4 4.859,34.4 ccw(c4.859,34.628) 4.859,34.857 4.418,34.857 cw(c4.418,35.086) 4.418,35.314 4.859,35.314 ccw(c4.859,35.543) 4.859,35.771 4.417,35.771 cw(c4.417,36) 4.417,36.229 4.859,36.229 ccw(c4.859,36.457) 4.859,36.686 4.416,36.686 cw(c4.416,36.914) 4.416,37.143 4.859,37.143 ccw(c4.859,37.372) 4.859,37.6 4.414,37.6 cw(c4.414,37.829) 4.414,38.057 4.859,38.057 ccw(c4.859,38.286) 4.859,38.515 4.413,38.515 cw(c4.413,38.743) 4.413,38.972 4.746,38.972 ccw(c4.746,39.2) 4.746,39.429 4.365,39.429 cw(c4.365,39.658) 4.365,39.886 4.427,39.886 ccw(c4.427,40.115) 4.427,40.343 cw(c4.427,40.572) 4.199,40.572 4.199,44.272 4.199,44.483 18.364,58.649 v1(18.364,59.512)
LCD_DB10: J4.26 U7.6 | length 76
  Top Layer w0.254: v1(17.704,60.046) 17.704,59.31 19.547,57.467 ; 19.547,57.466 19.612,57.401 19.612,55.866 J4.26@19.615,55.863
  Top Layer w0.305: U7.6@2.929,18.024 v1(2.929,19.32)
  Bottom Layer w0.203: v1(2.929,19.32) 2.929,26.365 2.929,26.467 ccw(c2.7,26.467) 2.7,26.695 2.268,26.695 cw(c2.268,26.924) 2.268,27.153 3.589,27.153 ccw(c3.589,27.381) 3.589,27.61 2.268,27.61 cw(c2.268,27.838) 2.268,28.067 3.589,28.067 ccw(c3.589,28.296) 3.589,28.524 3.157,28.524 cw(c3.157,28.753) 3.157,28.981 3.589,28.981 ccw(c3.589,29.21) 3.589,29.439 3.157,29.439 cw(c3.157,29.667) 3.157,29.896 3.589,29.896 ccw(c3.589,30.124) 3.589,30.353 3.157,30.353 cw(c3.157,30.582) 3.157,30.81 3.589,30.81 ccw(c3.589,31.039) 3.589,31.267 3.157,31.267 cw(c3.157,31.496) 3.157,31.725 3.589,31.725 ccw(c3.589,31.953) 3.589,32.182 3.157,32.182 cw(c3.157,32.41) 3.157,32.639 3.589,32.639 ccw(c3.589,32.868) 3.589,33.096 3.157,33.096 cw(c3.157,33.325) 3.157,33.553 3.589,33.553 ccw(c3.589,33.782) 3.589,34.011 3.157,34.011 cw(c3.157,34.239) 3.157,34.468 3.589,34.468 ccw(c3.589,34.696) 3.589,34.925 3.157,34.925 cw(c3.157,35.154) 3.157,35.382 3.589,35.382 ccw(c3.589,35.611) 3.589,35.839 3.157,35.839 cw(c3.157,36.068) 3.157,36.297 3.589,36.297 ccw(c3.589,36.525) 3.589,36.754 3.157,36.754 cw(c3.157,36.982) 3.157,37.211 3.589,37.211 ccw(c3.589,37.44) 3.589,37.668 3.157,37.668 cw(c3.157,37.897) 3.157,38.125 3.589,38.125 ccw(c3.589,38.354) 3.589,38.583 3.035,38.583 cw(c3.035,38.811) 3.035,39.04 3.542,39.04 ccw(c3.542,39.268) 3.542,39.497 3.157,39.497 cw(c3.157,39.726) 2.929,39.726 2.929,41.935 2.929,43.772 17.704,58.547 v1(17.704,60.046)
LCD_DB11: J4.27 U7.5 | length 76
  Top Layer w0.254: v1(17.018,59.385) 19.115,57.288 J4.27@19.115,55.863
  Top Layer w0.305: U7.5@1.659,18.024 v1(1.659,19.32)
  Bottom Layer w0.203: v1(1.659,19.32) 1.659,27.788 1.659,27.889 ccw(c1.43,27.889) 1.43,28.118 0.998,28.118 cw(c0.998,28.346) 0.998,28.575 2.319,28.575 ccw(c2.319,28.804) 2.319,29.032 0.998,29.032 cw(c0.998,29.261) 0.998,29.489 2.319,29.489 ccw(c2.319,29.718) 2.319,29.947 0.998,29.947 cw(c0.998,30.175) 0.998,30.404 2.319,30.404 ccw(c2.319,30.632) 2.319,30.861 0.998,30.861 cw(c0.998,31.09) 0.998,31.318 2.319,31.318 ccw(c2.319,31.547) 2.319,31.775 1.883,31.775 cw(c1.883,32.004) 1.883,32.233 2.319,32.233 ccw(c2.319,32.461) 2.319,32.69 1.883,32.69 cw(c1.883,32.918) 1.883,33.147 2.319,33.147 ccw(c2.319,33.376) 2.319,33.604 1.883,33.604 cw(c1.883,33.833) 1.883,34.061 2.319,34.061 ccw(c2.319,34.29) 2.319,34.519 1.883,34.519 cw(c1.883,34.747) 1.883,34.976 2.319,34.976 ccw(c2.319,35.204) 2.319,35.433 1.883,35.433 cw(c1.883,35.662) 1.883,35.89 2.319,35.89 ccw(c2.319,36.119) 2.319,36.347 1.883,36.347 cw(c1.883,36.576) 1.883,36.805 2.319,36.805 ccw(c2.319,37.033) 2.319,37.262 1.883,37.262 cw(c1.883,37.49) 1.883,37.719 2.319,37.719 ccw(c2.319,37.948) 2.319,38.176 1.883,38.176 cw(c1.883,38.405) 1.883,38.633 2.196,38.633 ccw(c2.196,38.862) 2.196,39.091 1.883,39.091 cw(c1.883,39.319) 1.883,39.548 1.887,39.548 ccw(c1.887,39.776) 1.887,40.005 cw(c1.887,40.234) 1.659,40.234 1.659,40.843 1.659,43.162 17.018,58.522 17.018,59.36 v1@16.993,59.385
LCD_DB13: J4.29 U7.4 | length 76
  Top Layer w0.254: v1(16.358,60.046) 16.358,59.157 18.115,57.399 J4.29@18.115,55.863
  Top Layer w0.305: U7.4@0.389,18.024 v1(0.389,19.32)
  Bottom Layer w0.203: v1(0.389,19.32) 0.389,31.369 0.389,31.928 cw(c0.617,31.928) 0.617,32.156 1.049,32.156 ccw(c1.049,32.385) 1.049,32.614 0.178,32.614 cw(c0.178,32.842) 0.178,33.071 1.049,33.071 ccw(c1.049,33.299) 1.049,33.528 0.178,33.528 cw(c0.178,33.757) 0.178,33.985 1.049,33.985 ccw(c1.049,34.214) 1.049,34.442 0.178,34.442 cw(c0.178,34.671) 0.178,34.9 1.049,34.9 ccw(c1.049,35.128) 1.049,35.357 0.178,35.357 cw(c0.178,35.585) 0.178,35.814 1.049,35.814 ccw(c1.049,36.043) 1.049,36.271 0.178,36.271 cw(c0.178,36.5) 0.178,36.728 1.049,36.728 ccw(c1.049,36.957) 1.049,37.186 0.178,37.186 cw(c0.178,37.414) 0.178,37.643 1.049,37.643 ccw(c1.049,37.871) 1.049,38.1 0.178,38.1 cw(c0.178,38.329) 0.178,38.557 1.049,38.557 ccw(c1.049,38.786) 1.049,39.014 0.057,39.014 cw(c0.057,39.243) 0.057,39.472 1.049,39.472 ccw(c1.049,39.7) 1.049,39.929 -0.383,39.929 cw(c-0.383,40.157) -0.383,40.386 0.723,40.386 ccw(c0.723,40.615) 0.723,40.843 0.617,40.843 cw(c0.617,41.072) 0.389,41.072 0.389,42.502 16.358,58.471 v1(16.358,60.046)
LCD_DB14: J4.30 U7.15 | length 76
  Top Layer w0.203: U7.15@14.305,19.761 U7.15@14.339,19.794
  Top Layer w0.254: v1(15.621,61.239) 15.621,59.258 17.615,57.264 J4.30@17.615,55.863
  Top Layer w0.305: v1(-1.016,21.133) 9.601,21.133 9.627,21.133 10.998,19.761 U7.15@14.305,19.761
  Bottom Layer w0.203: v1(-1.016,21.133) -2.413,22.53 -2.413,52.984 5.842,61.239 v1(15.621,61.239)
LCD_DB15: J4.31 U7.38 | length 76.3
  Top Layer w0.254: v1(-3.124,39.319) -0.869,37.064 U7.38@-0.869,35.537 ; v1(13.843,61.824) 13.843,60.376 17.115,57.104 J4.31@17.115,55.863
  Bottom Layer w0.203: v1(-3.124,39.319) -3.124,53.061 -2.489,53.696 -1.968,54.216 -1.897,54.288 ccw(c-2.04,54.432) -1.897,54.576 -2.344,55.023 cw(c-2.272,55.095) -2.344,55.167 cw(c-2.272,55.095) -2.201,55.167 -1.557,54.523 ccw(c-1.485,54.595) -1.413,54.523 ccw(c-1.485,54.595) -1.413,54.667 -2.101,55.354 cw(c-2.029,55.426) -2.101,55.498 cw(c-2.029,55.426) -1.957,55.498 -1.269,54.81 ccw(c-1.198,54.882) -1.126,54.81 ccw(c-1.198,54.882) -1.126,54.954 -1.813,55.642 cw(c-1.742,55.714) -1.813,55.786 cw(c-1.742,55.714) -1.67,55.786 -0.982,55.098 ccw(c-0.91,55.17) -0.838,55.098 ccw(c-0.91,55.17) -0.838,55.241 -1.526,55.929 cw(c-1.454,56.001) -1.526,56.073 cw(c-1.454,56.001) -1.382,56.073 -0.695,55.385 ccw(c-0.623,55.457) -0.551,55.385 ccw(c-0.623,55.457) -0.551,55.529 -1.239,56.217 cw(c-1.167,56.288) -1.239,56.36 cw(c-1.167,56.288) -1.095,56.36 -0.407,55.673 ccw(c-0.336,55.744) -0.264,55.673 ccw(c-0.336,55.744) -0.264,55.816 -0.951,56.504 cw(c-0.88,56.576) -0.951,56.648 cw(c-0.88,56.576) -0.808,56.648 -0.12,55.96 ccw(c-0.048,56.032) 0.024,55.96 ccw(c-0.048,56.032) 0.024,56.104 -0.664,56.791 cw(c-0.592,56.863) -0.664,56.935 cw(c-0.592,56.863) -0.52,56.935 0.167,56.247 ccw(c0.239,56.319) 0.311,56.247 ccw(c0.239,56.319) 0.311,56.391 -0.377,57.079 cw(c-0.305,57.151) -0.377,57.222 cw(c-0.305,57.151) -0.233,57.222 0.455,56.535 ccw(c0.527,56.606) 0.598,56.535 ccw(c0.527,56.606) 0.598,56.678 -0.089,57.366 cw(c-0.017,57.438) -0.089,57.51 cw(c-0.017,57.438) 0.054,57.51 0.742,56.822 ccw(c0.814,56.894) 0.886,56.822 ccw(c0.814,56.894) 0.886,56.966 0.198,57.653 cw(c0.27,57.725) 0.198,57.797 cw(c0.27,57.725) 0.342,57.797 1.029,57.109 ccw(c1.101,57.181) 1.173,57.109 ccw(c1.101,57.181) 1.173,57.253 0.485,57.941 cw(c0.557,58.013) 0.485,58.084 cw(c0.557,58.013) 0.629,58.084 1.317,57.397 ccw(c1.389,57.469) 1.461,57.397 ccw(c1.389,57.469) 1.461,57.54 0.773,58.228 cw(c0.845,58.3) 0.773,58.372 cw(c0.845,58.3) 0.916,58.372 1.604,57.684 ccw(c1.676,57.756) 1.748,57.684 ccw(c1.676,57.756) 1.748,57.828 1.06,58.516 cw(c1.132,58.587) 1.06,58.659 cw(c1.132,58.587) 1.204,58.659 1.892,57.971 ccw(c1.963,58.043) 2.035,57.971 ccw(c1.963,58.043) 2.035,58.115 1.348,58.803 cw(c1.419,58.875) 1.348,58.947 cw(c1.419,58.875) 1.491,58.947 1.983,58.455 ccw(c2.127,58.599) 2.27,58.455 2.692,58.877 2.997,59.182 5.639,61.824 v1(13.843,61.824)
LCD_DB16: J4.32 U7.39 | length 73.6
  Top Layer w0.203: v1(-3.734,60.046) v1(6.579,60.046)
  Top Layer w0.254: v1(-3.734,38.71) -2.139,37.115 U7.39@-2.139,35.537 ; v1@13.03,59.563 v1@13.119,59.652 ; v1(13.03,59.741) 13.818,59.741 16.615,56.943 J4.32@16.615,55.863
  Bottom Layer w0.203: v1(-3.734,38.71) -3.734,46.152 -3.734,46.253 ccw(c-3.962,46.253) -3.962,46.482 -4.505,46.482 cw(c-4.505,46.711) -4.505,46.939 -3.734,46.939 ccw(c-3.734,47.168) -3.734,47.396 -4.505,47.396 cw(c-4.505,47.625) -4.505,47.854 -3.734,47.854 ccw(c-3.734,48.082) -3.734,48.311 -4.505,48.311 cw(c-4.505,48.539) -4.505,48.768 -3.734,48.768 ccw(c-3.734,48.997) -3.734,49.225 -4.505,49.225 cw(c-4.505,49.454) -4.505,49.682 -3.734,49.682 ccw(c-3.734,49.911) -3.734,50.14 -4.505,50.14 cw(c-4.505,50.368) -4.505,50.597 -3.734,50.597 ccw(c-3.734,50.825) -3.734,51.054 -4.505,51.054 cw(c-4.505,51.283) -4.505,51.511 -3.734,51.511 ccw(c-3.734,51.74) -3.734,51.968 -4.505,51.968 cw(c-4.505,52.197) -4.505,52.426 -3.734,52.426 ccw(c-3.734,52.654) -3.734,52.883 -4.505,52.883 cw(c-4.505,53.111) -4.505,53.34 -3.612,53.34 ccw(c-3.612,53.569) -3.612,53.797 -4.505,53.797 cw(c-4.505,54.026) -4.505,54.254 -2.962,54.254 ccw(c-2.962,54.483) -2.962,54.712 -4.505,54.712 cw(c-4.505,54.94) -4.505,55.169 -2.982,55.169 ccw(c-2.982,55.397) -2.982,55.626 -4.505,55.626 cw(c-4.505,55.855) -4.505,56.083 -3.962,56.083 ccw(c-3.962,56.312) -3.734,56.312 -3.734,56.947 -3.734,59.487 v1(-3.734,60.046) ; v1(6.579,60.046) 12.713,60.046 13.018,59.741 v1(13.03,59.741)